# Altium PCB PCB_GTV3.3.PcbDoc (part 11 of 11)
Units mil, origin at the board's own origin, x right, y up, seen from the top; angles counter-clockwise.
Board outline 8070.87 x 4881.89 mil, 4 copper layers (Top Layer, GND, PWR, Bottom Layer), stack 61.653 mil thick; 464 components, 293 nets, 1458 pads, 748 vias.
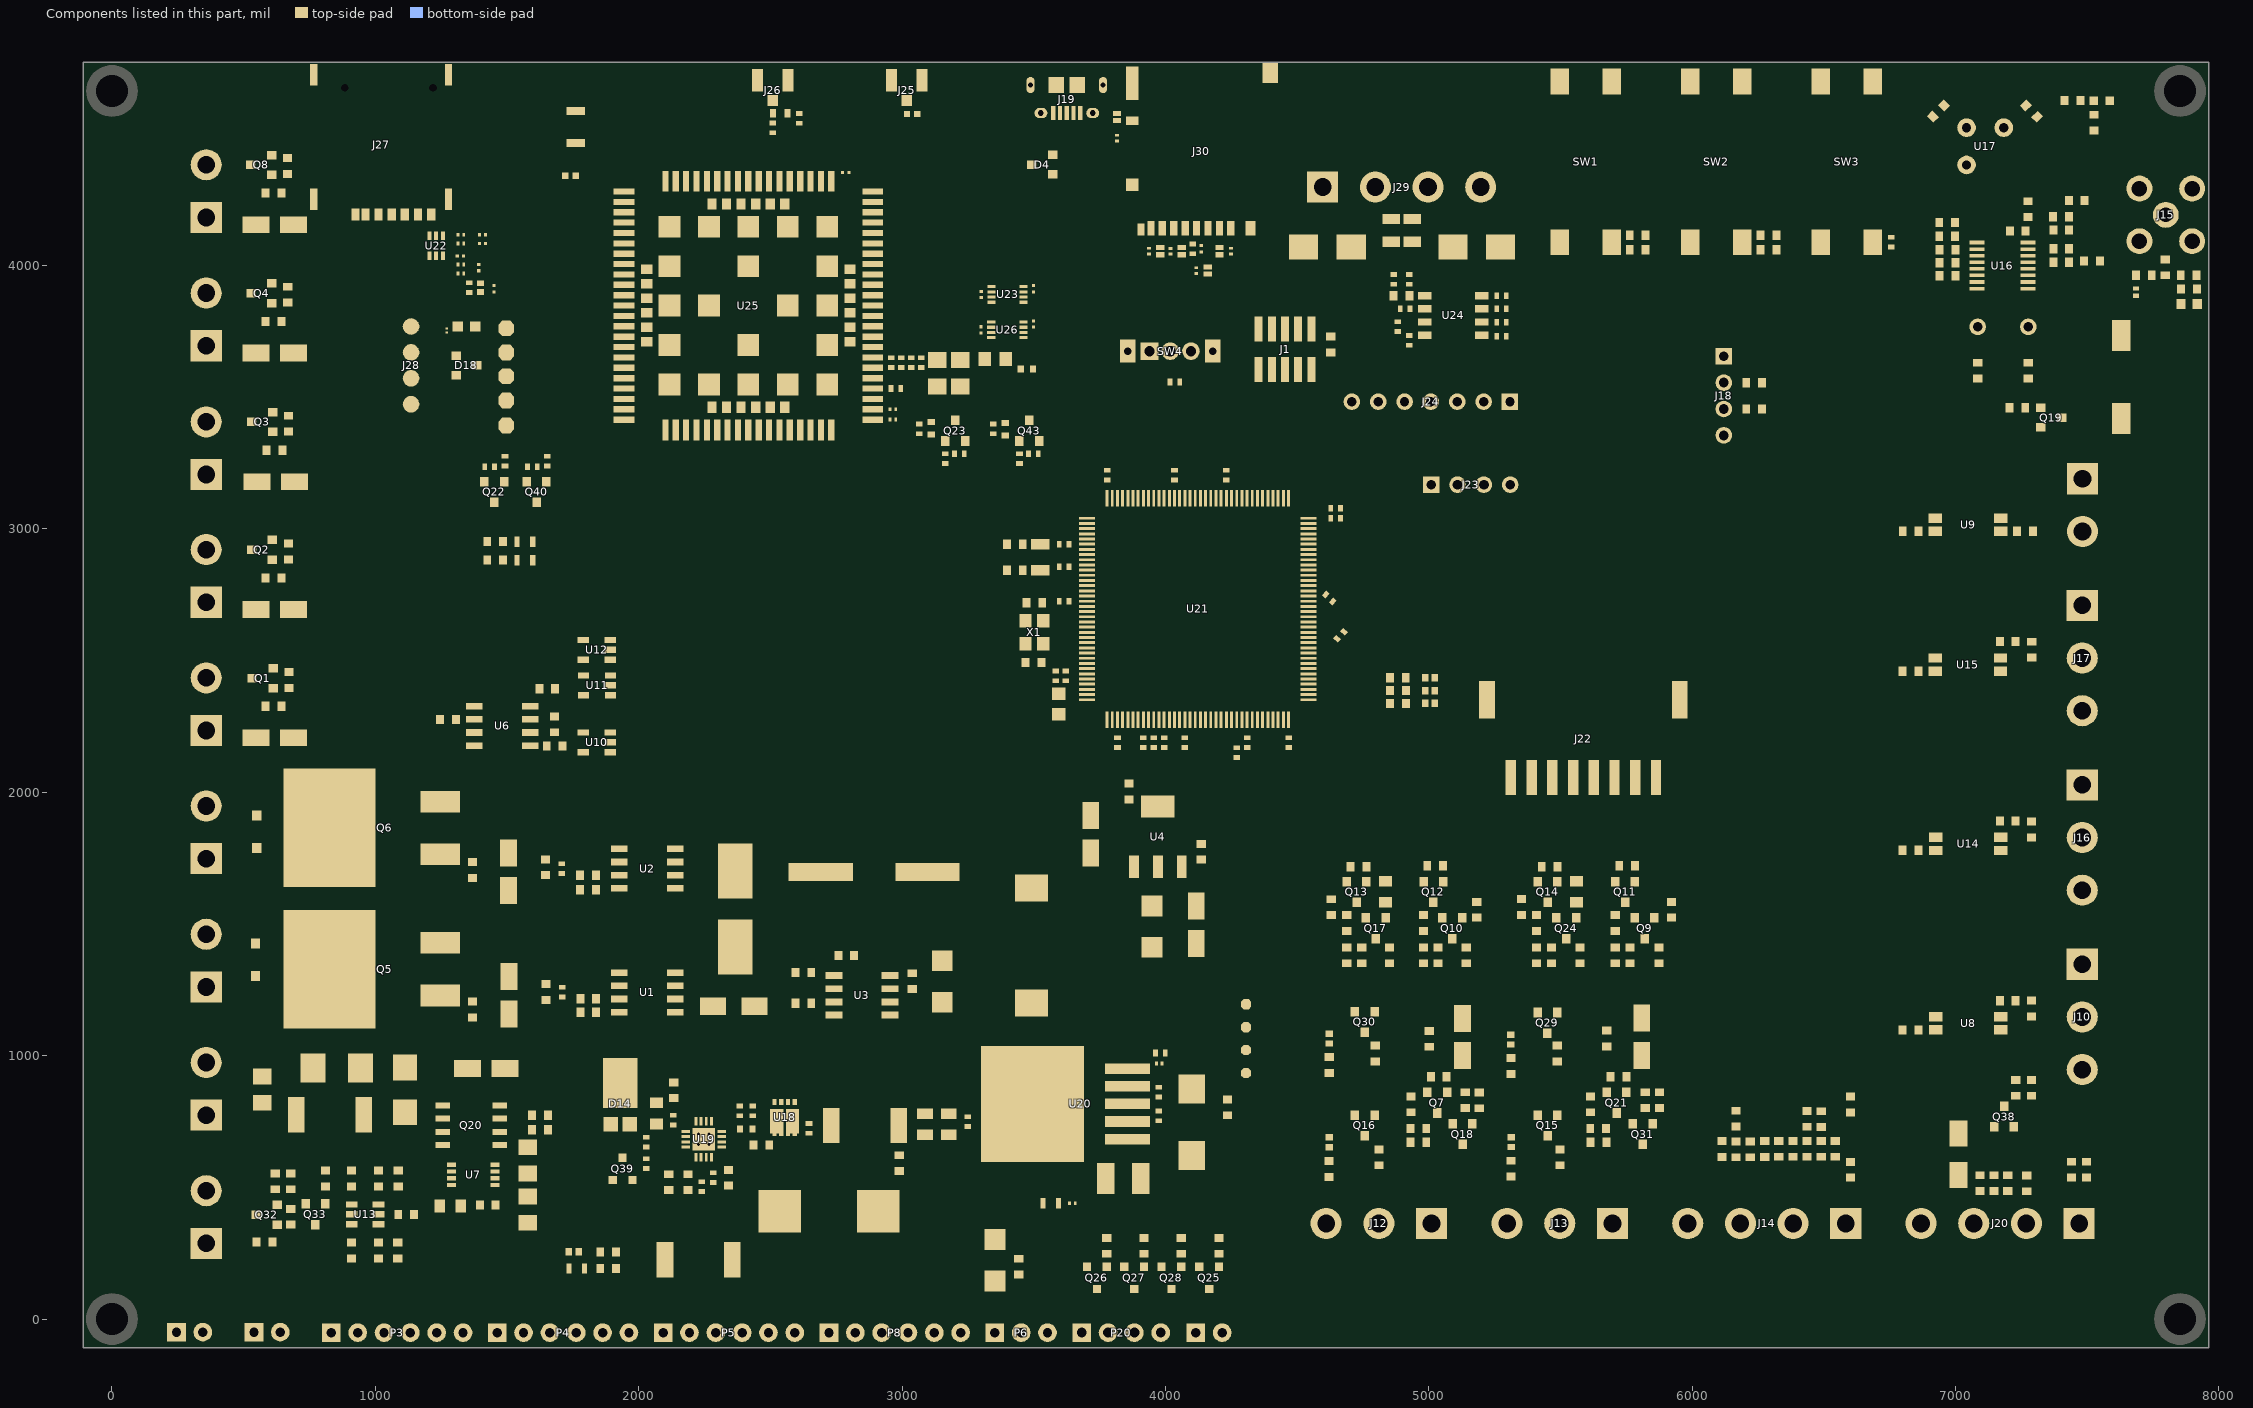
[diagram p8: the components of this part, seen from the top]

## Silkscreen, mask and mechanical layers (free items; w line width, h text height) (continued)
Drill Drawing:
  circle w10: c9169.06,3663.33 r33.33
  lines w10: 9135.73,2429.99 9169.06,2446.66 9202.4,2429.99 9185.73,2463.33 9202.4,2496.66 9169.06,2479.99 9135.73,2496.66 9152.4,2463.33 9135.73,2429.99 ; 9135.73,2596.66 9152.4,2596.66 9152.4,2579.99 9185.73,2579.99 9185.73,2596.66 9202.4,2596.66 9202.4,2629.99 9185.73,2629.99 9185.73,2646.66 9152.4,2646.66 9152.4,2629.99 9135.73,2629.99 9135.73,2596.66 ; 9135.73,2746.66 9152.4,2746.66 9169.06,2729.99 9185.73,2746.66 9202.4,2746.66 9185.73,2763.33 9202.4,2779.99 9185.73,2779.99 9169.06,2796.66 9152.4,2779.99 9135.73,2779.99 9152.4,2763.33 9135.73,2746.66 ; 9135.73,2946.66 9202.4,2946.66 9169.06,2879.99 9135.73,2946.66 ; 9135.73,3029.99 9135.73,3046.66 9152.4,3063.33 9135.73,3079.99 9135.73,3096.66 9152.4,3096.66 9169.06,3079.99 9185.73,3096.66 9202.4,3096.66 9202.4,3079.99 9185.73,3063.33 9202.4,3046.66 9202.4,3029.99 9185.73,3029.99 9169.06,3046.66 9152.4,3029.99 9135.73,3029.99 ; 9135.73,3246.66 9202.4,3246.66 9169.06,3179.99 9135.73,3246.66 ; 9135.73,3329.99 9202.4,3329.99 9202.4,3396.66 9135.73,3396.66 9135.73,3329.99 ; 9135.73,3479.99 9135.73,3496.66 9152.4,3513.33 9135.73,3529.99 9135.73,3546.66 9152.4,3546.66 9169.06,3529.99 9185.73,3546.66 9202.4,3546.66 9202.4,3529.99 9185.73,3513.33 9202.4,3496.66 9202.4,3479.99 9185.73,3479.99 9169.06,3496.66 9152.4,3479.99 9135.73,3479.99 ; 9135.73,3779.99 9202.4,3779.99 9202.4,3846.66 9135.73,3846.66 9135.73,3779.99 ; 9135.73,3963.33 9169.06,3929.99 9202.4,3963.33 9169.06,3996.66 9135.73,3963.33 ; 9135.73,4096.66 9152.4,4096.66 9169.06,4079.99 9185.73,4096.66 9202.4,4096.66 9185.73,4113.33 9202.4,4129.99 9185.73,4129.99 9169.06,4146.66 9152.4,4129.99 9135.73,4129.99 9152.4,4113.33 9135.73,4096.66 ; 9149.06,2753.33 9159.06,2753.33 9169.06,2743.33 9179.06,2753.33 9189.06,2753.33 9179.06,2763.33 9189.06,2773.33 9179.06,2773.33 9169.06,2783.33 9159.06,2773.33 9149.06,2773.33 9159.06,2763.33 9149.06,2753.33 ; 9149.06,2933.33 9189.06,2933.33 9169.06,2893.33 9149.06,2933.33 ; 9149.06,3493.33 9149.06,3503.33 9159.06,3513.33 9149.06,3523.33 9149.06,3533.33 9159.06,3533.33 9169.06,3523.33 9179.06,3533.33 9189.06,3533.33 9189.06,3523.33 9179.06,3513.33 9189.06,3503.33 9189.06,3493.33 9179.06,3493.33 9169.06,3503.33 9159.06,3493.33 9149.06,3493.33 ; 9149.06,3793.33 9189.06,3793.33 9189.06,3833.33 9149.06,3833.33 9149.06,3793.33
  lines w15: 9075.94,2384.99 16625.86,2384.99 ; 9075.94,4184.99 16625.86,4184.99 ; 9626.81,2234.99 9626.81,4334.99 ; 10226.66,2234.99 10226.66,4334.99 ; 11366.32,2234.99 11366.32,4334.99 ; 11872.2,2234.99 11872.2,4334.99 ; 12606,2234.99 12606,4334.99 ; 14105.55,2234.99 14105.55,4334.99 ; 14695.4,2234.99 14695.4,4334.99 ; 15441.2,2234.99 15441.2,4334.99 ; 9075.94,2234.99 16625.86,2234.99 16625.86,4334.99 9075.94,4334.99 9075.94,2234.99
  text "Symbol" at 9165.94,4229.99 h72
  text "Count" at 9671.81,4229.99 h72
  text "Hole Size" at 10271.66,4229.99 h72
  text "Plated" at 11411.32,4229.99 h72
  text "Hole Type" at 11917.2,4229.99 h72
  text "Drill Layer Pair" at 12651,4229.99 h72
  text "Via/Pad" at 14150.55,4229.99 h72
  text "Pad Shape" at 14740.4,4229.99 h72
  text "Template" at 15486.2,4229.99 h72
  text "752" at 9671.81,4079.99 h60
  text "11.81mil (0.300mm)" at 10271.66,4079.99 h60
  text "PTH" at 11411.32,4079.99 h60
  text "Round" at 11917.2,4079.99 h60
  text "Top Layer - Bottom Layer" at 12651,4079.99 h60
  text "(Mixed)" at 14150.55,4079.99 h60
  text "Rounded" at 14740.4,4079.99 h60
  text "(Mixed)" at 15486.2,4079.99 h60
  text "2" at 9671.81,3929.99 h60
  text "19.69mil (0.500mm)" at 10271.66,3929.99 h60
  text "PTH" at 11411.32,3929.99 h60
  text "Slot" at 11917.2,3929.99 h60
  text "Top Layer - Bottom Layer" at 12651,3929.99 h60
  text "Pad" at 14150.55,3929.99 h60
  text "Rounded" at 14740.4,3929.99 h60
  text "r80_155h50_115r100" at 15486.2,3929.99 h60
  text "2" at 9671.81,3779.99 h60
  text "21.65mil (0.550mm)" at 10271.66,3779.99 h60
  text "PTH" at 11411.32,3779.99 h60
  text "Slot" at 11917.2,3779.99 h60
  text "Top Layer - Bottom Layer" at 12651,3779.99 h60
  text "Pad" at 14150.55,3779.99 h60
  text "Rounded" at 14740.4,3779.99 h60
  text "r100_125h55_85r100" at 15486.2,3779.99 h60
  text "2" at 9671.81,3629.99 h60
  text "27.56mil (0.700mm)" at 10271.66,3629.99 h60
  text "PTH" at 11411.32,3629.99 h60
  text "Rectangle" at 11917.2,3629.99 h60
  text "Top Layer - Bottom Layer" at 12651,3629.99 h60
  text "Pad" at 14150.55,3629.99 h60
  text "Rectangle" at 14740.4,3629.99 h60
  text "(Mixed)" at 15486.2,3629.99 h60
  text "2" at 9671.81,3479.99 h60
  text "29.53mil (0.750mm)" at 10271.66,3479.99 h60
  text "NPTH" at 11411.32,3479.99 h60
  text "Round" at 11917.2,3479.99 h60
  text "Top Layer - Bottom Layer" at 12651,3479.99 h60
  text "Pad" at 14150.55,3479.99 h60
  text "Rectangle" at 14740.4,3479.99 h60
  text "s0hn75" at 15486.2,3479.99 h60
  text "45" at 9671.81,3329.99 h60
  text "35.43mil (0.900mm)" at 10271.66,3329.99 h60
  text "PTH" at 11411.32,3329.99 h60
  text "Round" at 11917.2,3329.99 h60
  text "Top Layer - Bottom Layer" at 12651,3329.99 h60
  text "Pad" at 14150.55,3329.99 h60
  text "(Mixed)" at 14740.4,3329.99 h60
  text "(Mixed)" at 15486.2,3329.99 h60
  text "12" at 9671.81,3179.99 h60
  text "37.40mil (0.950mm)" at 10271.66,3179.99 h60
  text "PTH" at 11411.32,3179.99 h60
  text "Round" at 11917.2,3179.99 h60
  text "Top Layer - Bottom Layer" at 12651,3179.99 h60
  text "Pad" at 14150.55,3179.99 h60
  text "(Mixed)" at 14740.4,3179.99 h60
  text "(Mixed)" at 15486.2,3179.99 h60
  text "3" at 9671.81,3029.99 h60
  text "39.37mil (1.000mm)" at 10271.66,3029.99 h60
  text "PTH" at 11411.32,3029.99 h60
  text "Round" at 11917.2,3029.99 h60
  text "Top Layer - Bottom Layer" at 12651,3029.99 h60
  text "Pad" at 14150.55,3029.99 h60
  text "(Mixed)" at 14740.4,3029.99 h60
  text "(Mixed)" at 15486.2,3029.99 h60
  text "1" at 9671.81,2879.99 h60
  text "55.12mil (1.400mm)" at 10271.66,2879.99 h60
  text "PTH" at 11411.32,2879.99 h60
  text "Round" at 11917.2,2879.99 h60
  text "Top Layer - Bottom Layer" at 12651,2879.99 h60
  text "Pad" at 14150.55,2879.99 h60
  text "Rounded" at 14740.4,2879.99 h60
  text "c250h140" at 15486.2,2879.99 h60
  text "4" at 9671.81,2729.99 h60
  text "59.06mil (1.500mm)" at 10271.66,2729.99 h60
  text "PTH" at 11411.32,2729.99 h60
  text "Round" at 11917.2,2729.99 h60
  text "Top Layer - Bottom Layer" at 12651,2729.99 h60
  text "Pad" at 14150.55,2729.99 h60
  text "Rounded" at 14740.4,2729.99 h60
  text "c250h150" at 15486.2,2729.99 h60
  text "47" at 9671.81,2579.99 h60
  text "66.93mil (1.700mm)" at 10271.66,2579.99 h60
  text "PTH" at 11411.32,2579.99 h60
  text "Round" at 11917.2,2579.99 h60
  text "Top Layer - Bottom Layer" at 12651,2579.99 h60
  text "Pad" at 14150.55,2579.99 h60
  text "(Mixed)" at 14740.4,2579.99 h60
  text "(Mixed)" at 15486.2,2579.99 h60
  text "4" at 9671.81,2429.99 h60
  text "122.05mil (3.100mm)" at 10271.66,2429.99 h60
  text "PTH" at 11411.32,2429.99 h60
  text "Round" at 11917.2,2429.99 h60
  text "Top Layer - Bottom Layer" at 12651,2429.99 h60
  text "Pad" at 14150.55,2429.99 h60
  text "Rounded" at 14740.4,2429.99 h60
  text "c500h310" at 15486.2,2429.99 h60
  text "876 Total" at 9671.81,2279.99 h60
  text "Slot definitions :" at 9165.94,2135.02 h60
  text "Routed Path Length" at 10198.63,2135.02 h60
  text "= Calculated from tool start centre position to tool end centre position." at 11301.29,2135.02 h60
  text "Hole Length" at 10198.63,2035.05 h60
  text "= Routed Path Length + Tool Size = Slot length as defined in the PCB layout" at 10891.43,2035.05 h60

## Dimensions
7961.54,-109.43 to 7961.54,4782.46 on Dimensions
-109.33,4772.46 to 7961.54,4772.46 on Dimensions

## Text inside footprints (layer, text, board x,y; h text height)
J19: Top Overlay "Board Edge" at 3524.19,4736.38 h19.68
J22: Top Overlay "PCB Edge" at 5399,2353.66 h50
J27: Top Overlay "Board Edge" at 880.81,4719.44 h30
J30: Mechanical 13 "PCB Edge" at 4041,4736.96 h31.5